# Altium PCB asar_feather.PcbDoc (part 4 of 5)
Units mm, origin at the board's own origin, x right, y up, seen from the top; angles counter-clockwise.
Board outline 50.8 x 22.86 mm, 6 copper layers (Top Layer, L2-GND, L3-SIG, L4-SIG, L5-VCC3V3, Bottom Layer), stack 1.568 mm thick; 181 components, 156 nets, 840 pads, 1779 vias.
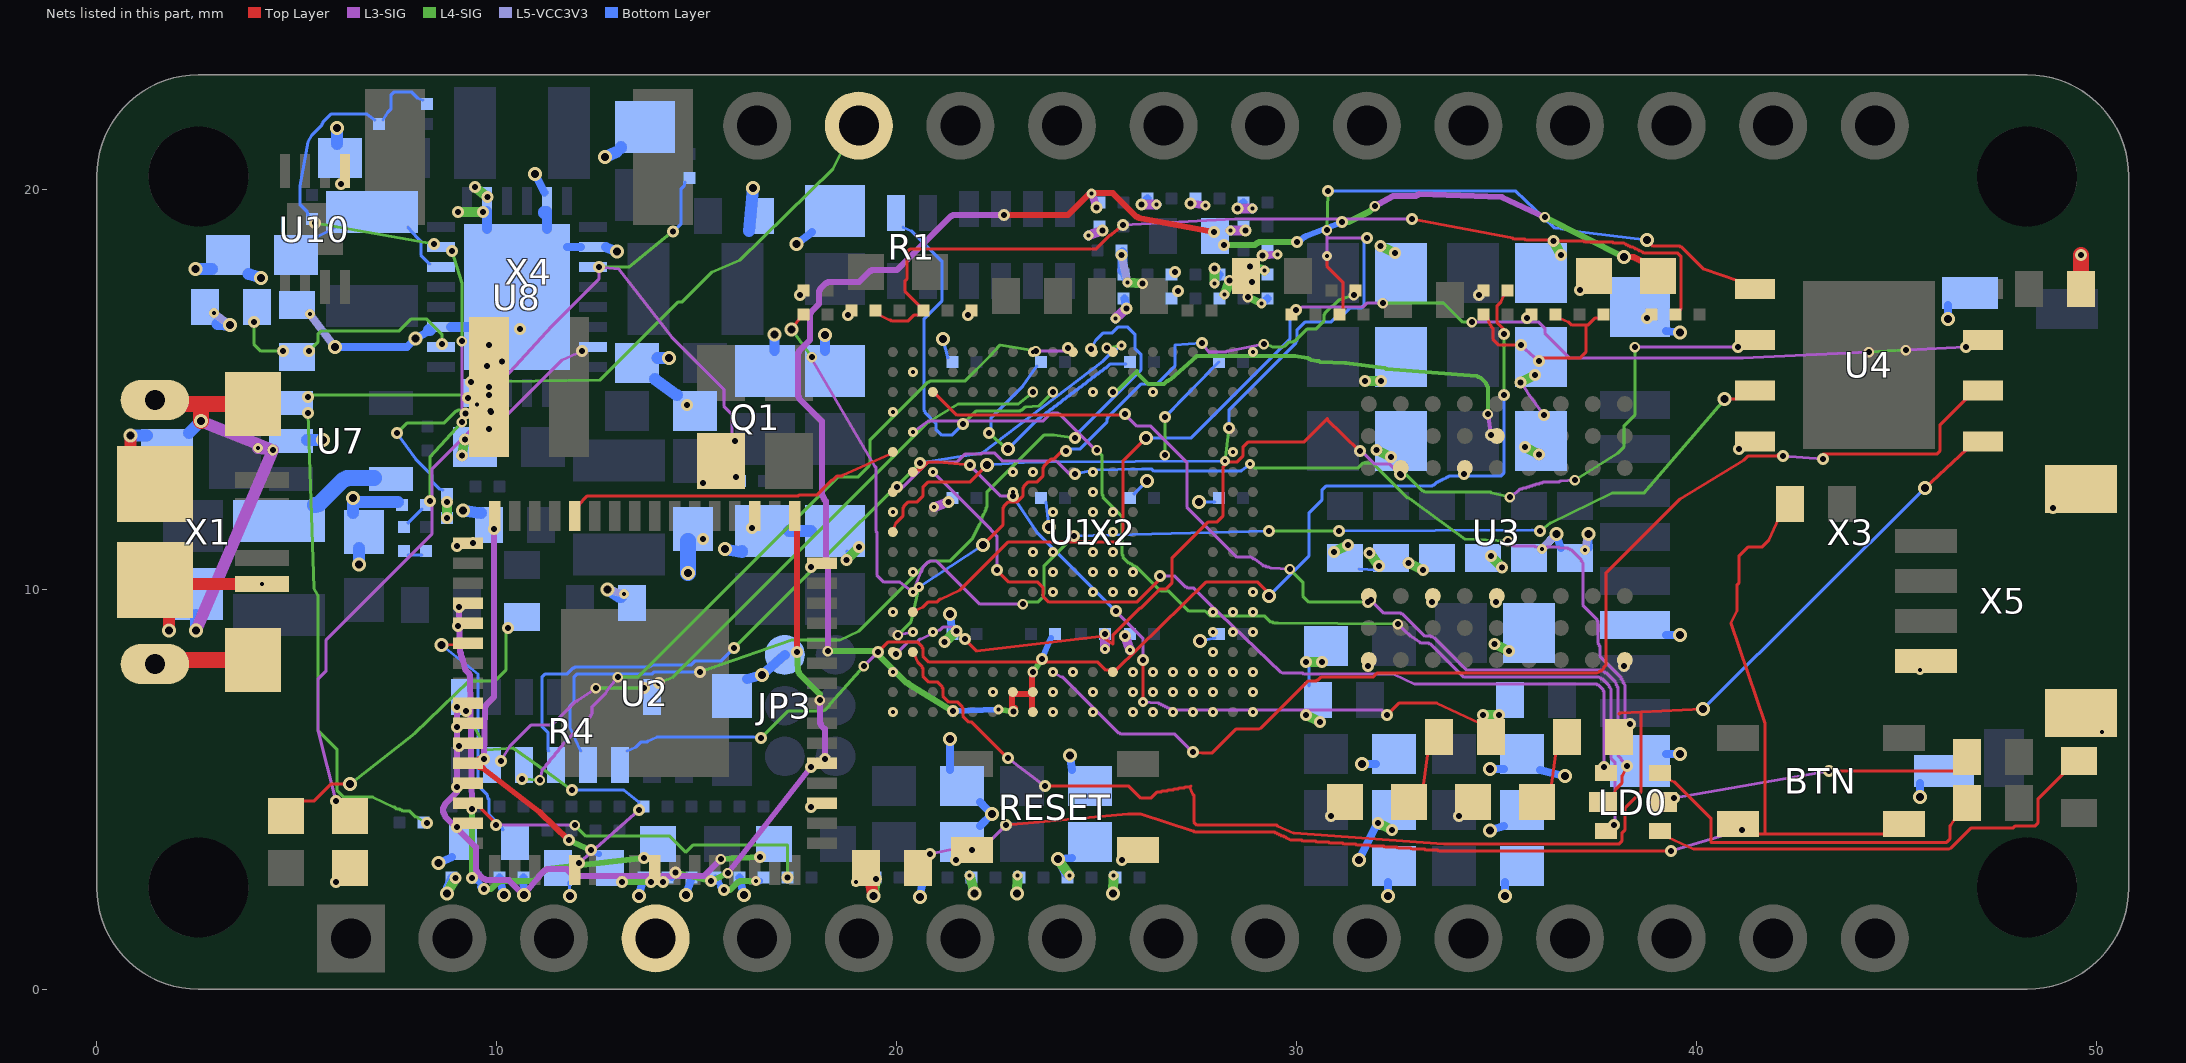
[diagram p7: the nets of this part, all layers, seen from the top]

## Via types
v1: diameter 0.27, hole 0.15, L3-SIG to L4-SIG, tented both sides, 307 vias
v2: diameter 0.3, hole 0.15, L5-VCC3V3 to Bottom Layer, tented both sides, 286 vias
v3: diameter 0.3, hole 0.15, L4-SIG to L5-VCC3V3, tented both sides, 241 vias
v4: diameter 0.3, hole 0.15, Top Layer to L2-GND, tented both sides, 219 vias
v5: diameter 0.3, hole 0.15, L2-GND to L3-SIG, tented both sides, 201 vias
v6: diameter 0.25, hole 0.1, Top Layer to L2-GND, tented both sides, 177 vias
v7: diameter 0.25, hole 0.1, L2-GND to L3-SIG, tented both sides, 125 vias
v8: diameter 0.35, hole 0.2, Top Layer to Bottom Layer, tented both sides, 109 vias
v9: diameter 0.25, hole 0.1, L4-SIG to L5-VCC3V3, tented both sides, 64 vias
v10: diameter 0.25, hole 0.1, L5-VCC3V3 to Bottom Layer, tented both sides, 46 vias
v11: diameter 0.3, hole 0.15, L3-SIG to L4-SIG, tented both sides, 4 vias

## Nets (pads, with @x,y where several pads share a name; then routed paths per layer and width w, separated by ;. In a path a pad name is that pad's centre, name@x,y a point inside that pad or via, vN(x,y) a via of type N, cw(c..) or ccw(c..) an arc to the next point about the centre after c; other vN are vias at no path point) (continued)
EN: R26.2 U7.3 U8.28 X2.18 | length 28
  L4-SIG w0.076: v3(5.275,14.4) 5.425,10.025 5.525,9.85 5.525,6.475 6,6 6,4.975 6.175,4.8 6.9,4.8 7.425,4.55 7.45,4.55 7.5,4.5 7.575,4.5 7.6,4.475 7.625,4.475 7.65,4.45 7.825,4.45 7.975,4.3 8,4.3 v3(8.25,4.15) ; v3(5.275,14.8) 5.325,14.85 9.2,14.85 v3(9.275,14.775) ; v3(9.35,15.175) 12.575,15.225 14.525,17.175 14.625,17.175 15.375,17.925 16.075,18.225 18.4,20.5 X2.18@18.65,21
  Bottom Layer w0.076: v3(5.275,14.4) U7.3@5.275,14.425
  other v2: 8.25,4.15 5.275,14.4 9.275,14.775 5.275,14.8 9.35,15.175
FLASH-CS#: R7.1 U1.K19 U4.1 | length 32
  Top Layer w0.076: U1.K19@19.925,11.525 19.975,11.65 20.15,11.825 20.15,12.025 20.175,12.05 20.175,12.075 20.275,12.175 20.5,12.175 20.65,12.325 20.65,12.55 20.775,12.675 21.825,12.675 v8(22.25,13.1) ; v6(30.75,18.325) 30.75,18.075 31.15,17.675 R7.1@31.15,16.975 ; v8(38.75,18.725) 38.9,18.575 39.575,18.575 39.6,18.55 39.625,18.55 40.175,18 U4.1@41.05,17.7
  L3-SIG w0.076: v6(30.75,18.325) v1(30.75,18.975) ; 30.75,18.775 v3(31.75,18.775)
  L4-SIG w0.076: v9(28.2,13.2) v3(28.3,14.025) ; v1(30.75,18.975) v3(30.775,19.95)
  Bottom Layer w0.076: v8(22.25,13.1) 23.375,13.175 23.725,13.175 v9(28.2,13.2) ; v3(28.3,14.025) 28.3,14.475 29.975,16.15 30,16.2 30,16.475 30.2,16.675 30.85,16.675 30.95,16.775 31.075,16.775 31.325,17.025 31.6,17.025 31.675,17.1 31.675,18.7 v3(31.75,18.775) ; v3(30.775,19.95) 35.475,19.95 36.425,19.05 36.45,19.025 36.6,19.025 36.625,19 36.775,19 36.8,18.975 36.85,18.975 36.875,18.95 36.9,18.95 v8(38.75,18.725)
  other v1: 31.75,18.775
  other v2: 28.3,14.025 31.75,18.775 30.775,19.95
  other v7: 30.75,18.325
  other v10: 28.2,13.2
FLASH-D00: U1.D18 U4.5 | length 35.4
  Top Layer w0.076: U1.D18@20.45,8.35 20.525,8.175 20.625,8.075 20.625,8.05 20.65,8.025 20.65,7.825 20.8,7.675 21.025,7.675 21.125,7.575 21.125,7.55 21.15,7.525 21.15,7.325 21.3,7.175 21.525,7.175 21.625,7.075 21.625,7.05 21.65,7.025 21.65,6.825 21.8,6.675 21.875,6.675 v4(22.775,5.775) ; v4(23.7,5.075) 25.8,5.075 26.1,4.775 26.35,4.775 26.5,4.925 26.6,4.925 26.625,4.95 26.75,4.95 26.775,4.975 26.9,4.975 26.925,5 27.025,5 27.05,5.025 27.175,5.025 27.2,5.05 27.325,5.05 ; 27.35,5.075 27.325,5.05 ; 38.05,6.875 38.075,6.9 38.1,6.9 v8(40.15,7) ; 38.6,6.925 38.6,4.925 38.2,4.525 38.2,3.975 38.125,3.9 38.125,3.7 38.05,3.625 33.675,3.625 29.925,3.9 29.525,4.075 29.5,4.1 27.5,4.1 27.425,4.175 27.425,4.85 27.4,4.875 27.325,5.05 ; v8(45.7,12.525) U4.5@46.75,13.5
  L3-SIG w0.076: v4(22.775,5.775) v4(23.7,5.075)
  Bottom Layer w0.076: v8(40.15,7) v8(45.7,12.525)
  other v5: 23.7,5.075 22.775,5.775
FLASH-D01: U1.D19 U4.2 | length 28.9
  Top Layer w0.076: v4(21.7,8.75) 22,8.45 25.075,8.812 25.238,8.738 25.4,8.625 25.4,8.85 26.075,9.525 26.1,9.525 26.575,10 26.725,10 26.875,10.15 26.875,10.775 27.775,11.675 28,11.675 28.15,11.825 28.15,13.05 28.275,13.175 28.5,13.175 28.65,13.325 28.65,13.55 28.775,13.675 30.175,13.675 30.772,14.272 ; 30.75,14.25 v4(31.575,13.45) ; v4(41.025,16.05) U4.2@41.05,16.05
  L3-SIG w0.076: v4(19.975,8.375) 20.275,8.675 20.5,8.675 20.575,8.75 20.6,8.75 21.05,8.975 21.075,8.975 21.15,9.05 21.4,9.05 v4(21.7,8.75) ; v4(31.575,13.45) 31.625,13.45 31.95,13.125 32.325,13.125 v1(32.6,12.85) ; v1(35.325,12.3) 35.55,12.475 35.575,12.5 35.625,12.5 35.65,12.525 35.725,12.525 35.75,12.55 35.8,12.55 35.825,12.575 35.875,12.575 35.9,12.6 35.95,12.6 35.975,12.625 36.05,12.625 36.075,12.65 36.125,12.65 36.15,12.675 36.55,12.675 36.575,12.7 36.6,12.7 v1(36.95,12.725) ; v1(38.45,16.05) v4(41.025,16.05)
  L4-SIG w0.076: v1(32.6,12.85) 32.75,12.85 33.15,12.45 33.175,12.45 33.2,12.425 34.85,12.425 34.875,12.4 v1(35.325,12.3) ; v1(36.95,12.725) 38.025,13.4 38.175,13.55 38.175,14.075 38.45,14.35 v1(38.45,16.05)
  other v5: 19.975,8.375 21.7,8.75 31.575,13.45 41.025,16.05
FLASH-D02: R2.1 U1.G18 U4.3 | length 32.2
  Top Layer w0.076: v8(17.37,16.495) R2.1@17.575,16.775 ; v8(40.695,14.75) U4.3@40.988,14.753
  L3-SIG w0.076: v1(17.875,15.8) 17.85,15.8 19.45,13.075 19.475,13.05 19.475,11.45 19.5,11.425 19.5,10.35 19.675,10.175 20.075,10.175 20.4,9.925 20.6,10.425 20.625,10.45 20.625,10.5 20.65,10.525 20.65,10.55 20.775,10.675 20.8,10.675 20.825,10.7 20.975,10.7 21.025,10.675 22.075,9.625 v1(23.15,9.625)
  L4-SIG w0.076: v8(17.37,16.495) v1(17.875,15.8) ; v1(23.15,9.625) 23.2,9.675 23.525,9.675 23.65,9.8 23.65,9.85 23.675,9.875 23.675,10.575 v3(24.425,11.325) ; v3(29.3,11.45) v3(31.05,11.45) ; v3(36.075,11.45) 36.335,11.65 37.875,12.4 38.675,12.4 v8(40.695,14.75)
  Bottom Layer w0.076: v3(24.425,11.325) v3(29.3,11.45) ; v3(31.05,11.45) 35.875,11.475 v3(36.075,11.45)
  other v2: 24.425,11.325 29.3,11.45 31.05,11.45 36.075,11.45
  other v6: 20.4,9.93
  other v7: 20.4,9.93
FLASH-D03: R6.1 U1.F18 U4.7 | length 31.5
  Top Layer w0.076: U1.F18@20.475,9.475 20.65,9.55 20.775,9.675 21,9.675 21.075,9.75 21.1,9.75 21.575,9.975 22.775,11.175 25.5,11.175 25.65,11.325 25.65,13.2 v8(26.225,13.775) ; v4(46.725,16.05) U4.7@46.75,16.05
  L3-SIG w0.076: v4(29.975,16.975) 30.125,17.05 31.65,17.05 31.75,17.15 v1(32.15,17.15) ; v1(34.375,16.675) 36.05,16.675 36.2,16.525 36.2,16.4 36.825,15.775 41.15,15.775 v1@44.306,15.931 ; v1(45.225,15.975) v1@45.25,15.975 ; v1@45.258,15.978 v4(46.725,16.05)
  L4-SIG w0.076: v1(32.15,17.15) 33.675,17.15 34.15,16.675 v1(34.375,16.675) ; v1(44.3,15.925) v1(45.225,15.975)
  Bottom Layer w0.076: v8(26.225,13.775) 27.35,13.775 29.825,16.25 29.825,16.825 v4(29.975,16.975)
  other v1: 29.975,16.975
  other v2: 29.975,16.975
  other v3: 29.975,16.975
  other v5: 46.725,16.05 29.975,16.975
FPGA-CCLK: U1.C11 U4.6 | length 29.1
  Top Layer w0.076: v4(27.4,5.925) 27.625,5.9 27.875,5.9 28.475,6.5 29.05,6.5 29.1,6.525 30.275,7.7 30.475,7.7 30.5,7.725 30.525,7.725 30.6,7.8 31.9,7.8 32,7.9 37.5,7.9 37.55,7.925 37.575,7.95 37.6,7.95 37.675,8.025 37.675,8.05 37.725,8.1 37.725,10.4 39.575,12.25 41.175,13.225 41.275,13.325 42,13.325 42.05,13.375 42.075,13.375 v4(42.15,13.325) ; v4(43.15,13.25) v4@43.15,13.375 ; v4@43.16,13.375 46,13.375 46.075,13.45 46.075,14.1 U4.6@46.75,14.775
  L3-SIG w0.076: v7@23.9,7.925 24.125,7.8 24.15,7.8 25.55,6.4 25.575,6.4 25.6,6.375 26.95,6.375 v4(27.4,5.925) ; v4(42.15,13.325) v4(43.15,13.25)
  other v5: 27.4,5.925 43.15,13.25 42.15,13.325
  other v6: 23.9,7.93
  other v7: 23.9,7.93
FPGA-DONE: R4.7 R4.15 U1.U12 | length 16.6
  L3-SIG w0.076: v2(10.1,5.7) 10.325,6.075 10.85,6.6 11.375,6.6 11.975,7.2 12,7.2 12.025,7.225 v1(12.475,7.525)
  L4-SIG w0.076: v1(12.475,7.525) v3(13.675,7.525) ; v3(14.05,7.65) 14.4,7.8 20.775,14.175 20.8,14.175 20.825,14.2 21.525,14.625 23.025,14.625 v1@23.4,14.925
  Bottom Layer w0.076: v3(13.675,7.525) R4.7@13.7,7.525
  other v1: 10.1,5.7 23.4,14.93
  other v2: 13.675,7.525 14.05,7.65
  other v3: 10.1,5.7
  other v6: 23.4,14.93
  other v7: 23.4,14.93
FPGA-INIT#: R1.1 U1.U11 | length 9.2
  L4-SIG w0.076: v3(21.65,14.125) 21.975,14.45 23.075,14.45 23.1,14.475 23.125,14.475 23.2,14.55 23.225,14.55 23.55,14.575 v1@23.9,14.925
  Bottom Layer w0.076: R1.1@20.15,19.05 20.375,18.95 21.125,18.2 21.125,17.2 20.675,16.75 20.675,14.475 20.7,14.45 20.7,14.425 20.975,14.15 20.975,14 21.125,13.85 21.375,13.85 v3(21.65,14.125)
  other v1: 23.9,14.93
  other v2: 21.65,14.125
  other v6: 23.9,14.93
  other v7: 23.9,14.93
FPGA-TCK: R4.11 R5.2 U1.C8 | length 31
  Top Layer w0.076: v4(19.525,8.425) 19.775,8.675 20.525,8.675 20.625,8.575 20.625,8.55 20.65,8.525 20.65,8.325 20.8,8.175 25.025,8.175 25.225,7.975 U1.C8@25.325,7.975 ; U1.C8@25.475,7.975 27.725,10.175 29.025,10.175 29.3,9.9 v8(29.3,9.825) ; v1(35.175,16.375) 35.175,16.5 35,16.675 35,17.075 35.1,17.175 R5.2@35.175,17.35
  L3-SIG w0.076: v1(19.175,8.075) v4(19.525,8.425)
  L4-SIG w0.076: v3(16.6,6.275) 17.275,6.95 18.15,6.95 18.2,6.975 18.325,7.1 18.325,7.125 18.35,7.15 v1(19.175,8.075) ; v3(35.175,14.85) v1(35.175,16.375)
  Bottom Layer w0.076: R4.11@13.25,5.95 13.475,6.05 13.6,6.175 13.75,6.175 13.775,6.2 14,6.3 16.425,6.3 v3(16.6,6.275) ; v8(29.3,9.825) 30.3,10.825 30.3,11.9 30.625,12.225 30.625,12.475 30.725,12.575 33.375,12.575 33.4,12.6 33.425,12.6 33.5,12.675 33.525,12.675 33.55,12.7 33.575,12.7 33.6,12.725 33.625,12.725 33.65,12.75 33.675,12.75 33.725,12.775 33.75,12.8 33.775,12.8 33.8,12.825 35.1,12.825 35.175,12.9 v3(35.175,14.85)
  other v2: 16.6,6.275 35.175,14.85
  other v4: 35.175,16.375
  other v5: 19.525,8.425 35.175,16.375
FPGA-TDI: R4.14 U1.W10 | length 19
  Top Layer w0.076: v4(24.275,16.025) U1.W10@24.325,15.975
  L3-SIG w0.076: v1(11.075,5.225) 11.125,5.45 11.125,5.475 11.225,5.575 11.225,5.6 11.325,5.7 11.325,5.725 11.45,5.85 11.45,5.875 11.55,5.975 11.55,6 11.65,6.1 11.65,6.125 12.35,6.825 12.35,6.85 12.375,6.875 12.375,7.05 12.725,7.4 12.75,7.45 v1(13.025,7.8) ; v1@23.471,15.95 24.2,15.95 v4(24.275,16.025)
  L4-SIG w0.076: v3(10.625,5.25) v1(11.075,5.225) ; v1(13.025,7.8) 13.525,7.8 18.525,12.8 19.025,12.8 19.3,13.075 19.3,13.1 19.325,13.125 19.325,13.725 20.775,15.175 20.8,15.175 20.825,15.2 21.7,15.2 22.317,15.817 ; 22.325,15.825 22.575,16.1 v1(23.475,15.95)
  other v2: 10.625,5.25
  other v5: 24.275,16.025
FPGA-TDO: R4.13 U1.W8 | length 20
  Top Layer w0.076: v6(25.25,16.03) U1.W8@25.3,16
  L4-SIG w0.076: v3(15.925,8.525) 18.625,11.225 v3(20.575,13.15) ; v6(25.25,16.03) v9(25.615,16.094)
  Bottom Layer w0.076: R4.13@11.3,5.95 11.275,5.975 11.275,6.425 11.125,6.575 11.125,7.8 11.2,7.875 11.75,7.875 11.9,8.025 11.925,8.025 11.95,8.05 13.8,8.05 13.825,8.075 13.85,8.075 13.875,8.1 14.85,8.1 14.95,8.2 15.6,8.2 v3(15.925,8.525) ; v3(20.575,13.15) 22.125,13.4 25.15,15.7 25.3,15.85 v9(25.615,16.094)
  other v1: 25.25,16.03
  other v2: 15.925,8.525 20.575,13.15
  other v7: 25.25,16.03
  other v10: 25.615,16.094
FPGA-TMS: R4.12 U1.W9 | length 22
  Top Layer w0.076: U1.W9@24.825,15.975 U1.W9@24.825,16
  L4-SIG w0.076: v3(15.075,7.925) 17.375,8.725 18.575,8.725 19.05,8.95 20.775,10.675 20.8,10.675 20.825,10.7 21.325,10.7 21.9,11.275 21.9,11.3 21.925,11.325 21.925,11.35 21.95,11.375 21.95,11.4 21.975,11.425 21.975,11.45 22,11.475 22,11.5 22.025,11.525 22.025,11.55 22.05,11.575 22.05,11.6 22.075,11.625 22.1,11.675 22.1,11.725 22.125,11.75 22.125,11.8 22.15,11.825 22.15,11.85 22.175,11.875 22.2,11.925 22.2,11.95 22.225,11.975 22.225,12.025 22.25,12.05 22.25,12.425 23.675,13.85 23.925,13.85 v3(24.45,13.775)
  Bottom Layer w0.076: R4.12@12.1,5.95 11.825,6.55 11.825,7.075 11.925,7.175 11.925,7.8 12,7.875 13.875,7.875 13.925,7.925 v3(15.075,7.925) ; v3(24.45,13.775) 24.45,13.825 26.1,15.475 26.1,15.875 25.95,16.025 25.95,16.375 25.775,16.55 25.525,16.55 25.447,16.472 ; v3(24.85,16) 24.975,16.225 25.15,16.4 25.375,16.4 25.45,16.475
  other v1: 24.85,16
  other v2: 15.075,7.925 24.45,13.775 24.85,16
  other v6: 24.85,16
  other v7: 24.85,16
FT-PWREN#: U1.P19 U2.60 | length 8.2
  Top Layer w0.076: U2.60@12.05,12.1 12.175,12.25 12.25,12.325 17.525,12.325 17.55,12.35 18,12.35 18.375,12.725 18.4,12.725 18.5,12.825 18.625,12.825 18.65,12.85 U1.P19@19.825,13.375
FT-REF: R18.2 U2.6 | length 5.6
  Top Layer w0.076: v8(8.62,8.605) U2.6@8.925,8.62
  Bottom Layer w0.076: v8(8.62,8.605) 9.525,7.88 9.525,5.1 9.75,4.875 9.775,4.775 9.8,4.75 9.8,4.375 10.125,4.05 R18.2@10.15,3.975
FT-RESETN: R19.1 U2.14 | length 9.1
  Top Layer w0.076: U2.14@9.55,4.55 9.575,4.55 9.975,4.15 v4(9.975,4.1)
  L3-SIG w0.076: v4(9.975,4.1) v1(11.95,4.1)
  L4-SIG w0.076: v1(11.95,4.1) 12.225,3.825 14.325,3.825 14.725,3.425 14.9,3.6 17.27,3.6 v3(17.27,2.795)
  other v2: 17.27,2.795
  other v5: 9.975,4.1
FT-VCORE: C139.2 C152.2 C153.2 C154.2 U2.12 U2.37 U2.49 U2.64 | length 23.3
  Top Layer w0.15: U2.12@9.55,5.55 9.65,5.525 11.075,4.425 v4(11.8,3.725) ; U2.12@9.55,5.75 v4(9.675,5.75) ; v4(9.925,11.5) U2.64@9.925,11.525 ; v4(17.5,8.425) U2.49@17.5,11.525
  L3-SIG w0.15: v4(9.675,5.75) 9.7,7.05 9.725,7.075 9.725,7.1 9.925,7.3 v4(9.925,11.5) ; v1(15.775,2.9) v4(17.85,5.55) ; v1(18.075,7.225) 18.075,6.65 18.1,6.625 18.1,6.6 18.2,6.5 v4(18.2,5.75)
  L4-SIG w0.15: v4(11.8,3.725) v3(12.35,3.475) ; v3(13.125,2.675) v3(14.15,2.675) ; v3(14.47,2.92) v3(15.35,2.7) v1(15.775,2.9) ; v3(15.675,2.475) 15.825,2.475 16.025,2.675 16.05,2.675 16.075,2.7 v9(16.475,2.7) ; v4(17.5,8.425) 17.525,7.95 17.55,7.925 17.55,7.9 18.075,7.375 v1(18.075,7.225)
  Bottom Layer w0.15: v3(12.35,3.475) C139.2@12.55,3.375 ; C139.2@13.1,2.675 v3(13.125,2.675) ; C152.2@14.375,2.775 v3(14.47,2.92) ; C153.2@15.47,2.795 v3(15.675,2.475) v2@15.575,2.55 ; v9(16.475,2.7) C154.2@16.575,2.7
  other v1: 11.8,3.725 17.5,8.425
  other v2: 15.675,2.475 13.125,2.675 14.15,2.675 15.35,2.7 14.47,2.92 12.35,3.475
  other v5: 11.8,3.725 17.85,5.55 9.675,5.75 18.2,5.75 17.5,8.425 9.925,11.5
  other v10: 16.475,2.7
FT-VPHY: C40.2 L4.1 U2.4 | length 11.6
  L3-SIG w0.15: v4(9.05,9.55) 9.075,8.5 9.075,8.425 9.1,8.4 9.1,8.325 9.125,8.3 9.125,8.25 9.15,8.225 9.175,8.125 9.2,8.025 9.2,8 9.3,7.9 9.3,7.875 9.325,7.85 v1(9.375,4.5)
  L4-SIG w0.15: v3(9.375,2.775) v1(9.375,4.5) ; v3(9.675,2.5) 9.85,2.5 10.025,2.675 10.05,2.675 10.075,2.7 10.925,2.7 11.2,2.975 11.225,2.975 11.25,3 v3(13.675,3.275)
  Bottom Layer w0.15: C40.2@9.47,2.795 v3(9.675,2.5) v2@9.575,2.55
  other v2: 9.675,2.5 9.375,2.775 13.675,3.275
  other v5: 9.05,9.55
FT-VPLL: C41.2 L5.1 U2.9 | length 13.1
  L3-SIG w0.15: v4(9,7.05) 9,4.925 8.7,4.625 8.7,4.6 8.675,4.575 8.675,4.55 8.65,4.525 8.65,4.425 8.675,4.4 8.675,4.375 8.7,4.35 8.7,4.325 9.475,3.55 9.475,2.975 9.5,2.95 9.5,2.925 9.675,2.75 9.7,2.75 9.725,2.725 10.3,2.725 v8(10.675,2.35) 11.025,2.775 11.05,2.8 11.05,2.825 11.2,2.975 11.225,2.975 11.25,3 11.75,3 11.9,2.85 11.925,2.85 11.95,2.825 15.175,2.825 v1(15.6,3.25)
  L4-SIG w0.15: v1(15.6,3.25) v3(16.575,3.3)
  Bottom Layer w0.15: v8(10.675,2.35) 10.675,2.55
  Bottom Layer w0.2: C41.2@10.67,2.795 v8(10.675,2.35)
  other v2: 16.575,3.3
  other v5: 9,7.05
GND: C3.1 C4.1 C5.1 C6.1 C7.1 C8.1 C9.1 C11.1 C12.1 C13.1 C38.1 C40.1 C41.1 C78.1 C80.1 C82.1 C84.1 C85.2 C86.2 C87.2 C88.2 C89.2 C90.2 C91.2 C92.2 C93.2 C94.2 C95.2 C96.2 C97.2 C98.2 C99.2 C100.2 C101.2 C102.2 C103.2 C104.2 C105.2 C106.2 C107.2 C108.2 C109.2 C110.2 C111.2 C112.2 C113.2 C114.2 C115.2 C116.2 C117.2 C118.2 C119.2 C120.2 C121.2 C122.2 C133.1 C134.1 C135.1 C136.1 C137.1 C138.1 C139.1 C140.2 C141.2 C142.2 C143.2 C144.2 C145.2 C146.2 C147.1 C148.1 C149.1 C150.1 C151.1 C152.1 C153.1 C154.1 C155.1 C156.1 C157.1 C158.1 C159.1 C160.1 C161.1 C167.1 C168.1 JP3.3 L6.1 LD1.K LD2.K LD3.K Q1.2 R5.1 R11.1 R13.2 R15.1 R17.2 R18.1 R21.1 R22.1 R86.1 R102.2 R103.2 R114.2 R116.2 RESET.3 RESET.4 U1.A1 U1.A3 U1.A4 U1.A5 U1.A6 U1.A7 U1.A9 U1.A11 U1.A19 U1.B1 U1.B3 U1.B4 U1.B5 U1.B6 U1.B7 U1.B9 U1.B11 U1.B14 U1.C1 U1.C2 U1.C3 U1.C4 U1.C5 U1.C6 U1.C7 U1.C10 U1.C19 U1.D3 U1.E1 U1.E2 U1.E3 U1.E17 U1.F1 U1.F2 U1.F3 U1.F19 U1.G1 U1.G7 U1.G8 U1.G9 U1.G11 U1.H7 U1.H8 U1.H9 U1.H11 U1.H12 U1.H18 U1.J8 U1.J9 U1.J11 U1.J12 U1.K8 U1.L8 U1.L9 U1.L11 U1.L19 U1.M9 U1.M13 U1.N9 U1.N12 U1.N13 U1.P2 U1.T19 U1.U6 U1.U9 U1.V18 U1.W1 U1.W12 U2.1 U2.5 U2.10 U2.11 U2.13 U2.15 U2.25 U2.35 U2.47 U2.51 U3.A1 U3.A3 U3.B7 U3.C3 U3.D7 U3.E3 U3.J1 U4.4 U7.2 U8.3 U8.10 U8.13 U8.16 U8.27 U8.29 U10.5 X1.5 X1.MH1 X1.MH2 X1.MP1 X1.MP2 X1.MP3 X1.MP4 X2.4 X3.6 X3.G1 X3.G2 X3.G3 X3.G4 X4.2 X5.1 X5.MP1 X5.MP2 | length 90.4
  Top Layer w0.3: X1.MP3@0.84,13.43 v8(0.84,13.84) ; X1.MP4@1.45,10.13 v6(4.125,10.13) ; v8(1.8,8.965) X1.MP4@1.8,9.43 ; R86.1@19.35,2.65 v8(19.415,2.325)
  Top Layer w0.4: X1.MH2@1.45,8.23 X1.MP2@3.9,8.23 ; X1.MH1@1.45,14.63 X1.MP1@3.9,14.63 ; v8(2.6,14.2) 2.6,14.63 ; C11.1@49.6,17.505 v4(49.6,18.35)
  L3-SIG w0.076: v5@35.6,15.175 35.75,14.95 35.775,14.9 v3(36.175,14.35)
  L3-SIG w0.2: v7(9.507,14.623) v10(9.837,14.45) ; v7(24.87,19.895) v2(24.995,19.545) ; v2(27.345,19.645) v7(27.72,19.595) ; v2(29.145,18.345) v7(29.52,18.37)
  L3-SIG w0.25: v7(20.933,12.05) v2(21.29,12.18) ; v7(24.795,18.845) v2(25.145,18.97) ; v7(25.2,8.5) v10(25.2,8.88) ; v7(25.47,16.77) v2(25.745,17.02) ; v2(25.705,8.83) v7(25.83,8.48) ; v2(26.12,19.62) v7(26.495,19.62) ; v7(28.34,18.97) v2(28.72,18.97) ; v2(28.52,19.52) v7(28.895,19.52)
  L3-SIG w0.3: v8(2.48,8.97) v10(4.4,13.48) ; v8(2.6,14.2) v10(4.4,13.48) ; v7(4.03,13.53) v10(4.4,13.48)
  L4-SIG w0.076: v3(22.3,13.9) v8(22.775,13.5) ; v1(26.7,13.35) 26.7,13.575 v3(26.7,14.3)
  L4-SIG w0.2: v1(28.776,17.306) v10(29.12,17.145)
  L4-SIG w0.25: v8(8.75,2.39) v3(8.965,2.775) ; v2(8.75,11.775) v1(8.75,12.175) ; v1(9.025,19.425) v3(9.65,19.425) ; v1(9.125,13.349) v2(9.2,13.738) ; v1(9.453,20.057) v2(9.763,19.81) ; v2(9.75,15.575) v1(10.129,15.689) ; v1(18.737,10.732) v2(19.055,11.05) ; v8(19.415,2.325) v3(19.48,2.75) ; v1(21.19,8.68) v2(21.49,8.955) ; v10(21.82,2.845) v8(21.945,2.392) ; v8(23,2.388) v10(23.02,2.845) ; v8(24.025,3.25) v10(24.32,2.845) ; v8(25.4,2.388) v10(25.42,2.845) ; v10(25.77,17.67) v1(26.145,17.645) ; v10(27.945,17.645) v1(27.945,18.02) ; v10(28.195,17.37) v1(28.32,17.72) ; v1(28.828,18.068) v10(29.195,17.97) ; v1(30.225,8.175) v2(30.63,8.18) ; v2(30.23,6.855) v1(30.584,6.678) ; v2(30.925,10.93) v1(31.279,11.107) ; v1(31.7,15.2) v2(32.1,15.2) ; v1(31.822,10.904) v2(32.05,10.58) ; v1(31.996,13.477) v2(32.35,13.3) ; v2(32.03,4.155) v1(32.384,3.978) ; v1(32.096,18.577) v2(32.45,18.4) ; v1(32.796,10.652) v2(33.15,10.475) ; v1(34.65,6.85) v3(35.05,6.85) ; v2(34.85,10.83) v1(35.127,10.547) ; v1(34.946,8.627) v2(35.3,8.45) ; v1(35.596,15.173) v2(35.95,15.35) ; v2(35.7,13.55) v1(36.054,13.373) ; v1(36.423,18.704) v2(36.6,18.35)
  L5-VCC3V3 w0.2: v10(2.925,16.9) v8(3.325,16.6) ; v10(5.325,16.875) v8(5.95,16.05) ; v8(12.77,9.991) v10(13.175,9.875) ; v2(25.62,18.35) v10(25.77,17.67) ; v10(36.125,11.005) v8(36.49,11.385) ; v10(37.2,10.98) v8(37.295,11.385)
  Bottom Layer w0.076: v8@8.75,2.525 v8@8.75,2.55 ; v8(10.175,2.35) 10.175,2.55 ; C139.1@11.8,2.675 v8(11.825,2.325) ; v8(13.55,2.325) 13.55,2.55 ; v8(14.725,2.35) 14.75,2.55 ; v8(16.175,2.35) 16.175,2.55 ; C97.2@17.875,18.925 C97.2@17.875,18.95 ; C86.2@18.75,10.925 C86.2@18.75,10.95 ; v8(20.575,2.3) 20.575,2.55 ; v8(21.15,16.25) C110.2@21.275,15.775 ; v3(22.3,13.9) 22.35,13.95 22.35,14.275 23.15,15.075 C107.2@23.5,15.575 ; v8(22.775,13.5) 23.55,14.275 23.575,14.275 23.65,14.35 23.675,14.35 23.75,14.425 23.775,14.425 23.85,14.5 23.875,14.5 23.95,14.575 23.975,14.575 24.05,14.65 24.075,14.65 24.175,14.75 24.2,14.75 24.275,14.825 24.3,14.825 24.375,14.9 24.4,14.9 24.475,14.975 24.5,14.975 24.575,15.05 24.6,15.05 24.675,15.125 24.7,15.125 24.8,15.225 24.825,15.225 24.9,15.3 24.925,15.3 25,15.375 25.025,15.375 25.1,15.45 25.125,15.45 25.2,15.525 25.225,15.525 25.325,15.625 C109.2@25.725,15.625 ; C89.2@23.725,12.175 v8(23.8,11.55) ; C90.2@25.925,12.375 v8(26.25,12.7) ; v3(26.7,14.3) C113.2@28.05,15.68 ; C114.2@26.975,17.375 v3(27.025,17.45) ; v8(27.55,12.175) C108.2@27.95,12.175 ; v8(27.575,8.7) C112.2@27.95,8.775 ; C9.1@30.3,7.575 C13.1@30.3,8.175 ; C8.1@31.55,10.5 C7.1@32,10.475 ; v2(33.15,10.475) C6.1@33.15,10.5 ; v3(35.05,6.85) C12.1@35.05,6.875 ; C142.2@36.175,14.3 36.175,14.325 v3(36.175,14.35)
  Bottom Layer w0.2: v8(5.95,16.05) 7.75,16.05 v8(7.97,16.27) U8.3@8.27,16.435 ; v8(8.545,3.155) R18.1@8.875,3.3 ; v8(8.75,2.39) 8.75,2.525 C40.1@8.87,2.795 ; U8.27@9.75,15.2 U8.29@9.75,15.55 ; C41.1@10.07,2.795 v8(10.175,2.35) ; v8(10.955,20.38) U8.13@11.19,19.92 ; U8.29@11.75,18.55 U8.16@12.1,18.55 ; v8(13.55,2.325) C152.1@13.67,2.795 ; v8(14.725,2.35) C153.1@14.87,2.795 ; C154.1@16.07,2.795 v8(16.175,2.35) ; v8(17.49,18.63) C97.2@17.875,18.925 ; v8(19.415,2.325) C155.1@19.47,2.795 ; v8(20.575,2.3) C156.1@20.67,2.795 ; C94.2@21.325,5.48 v8(21.325,6.25) ; v8(21.325,9.375) C95.2@21.39,8.88 ; C157.1@21.82,2.745 v8(21.945,2.392) ; C87.2@22.08,4.08 v8(22.375,4.375) C94.2@22.08,4.68 ; v8(23,2.388) C158.1@23.02,2.745 ; C159.1@24.22,2.88 v8(24.025,3.25) C88.2@24.38,3.28 ; v8(24.335,5.837) C99.2@24.38,5.48 ; v8(25.4,2.388) C38.1@25.42,2.745 ; C117.2@25.645,17.95 v10(25.77,17.67) ; C111.2@25.695,17.27 v2(25.745,17.02) ; v2(26.12,19.62) C137.1@26.27,19.77 ; v10(27.945,17.645) C119.2@28.07,17.87 ; v2(28.52,19.52) C136.1@28.67,19.67 ; v10(29.12,17.145) C116.2@29.27,17.27 ; v8(31.55,3.225) C103.2@31.98,4.08 ; v8(31.625,5.635) C105.2@31.98,5.635 ; v8(32.275,2.325) C101.2@32.275,2.68 ; v8(34.825,3.97) C104.2@35.18,4.08 ; v8(34.825,5.51) C106.2@35.18,5.51 ; v8(35.2,2.325) C102.2@35.2,2.68 ; C106.2@36.08,5.48 v8(36.7,5.325) ; C4.1@36.15,11.03 v8(36.49,11.385) C3.1@36.6,11.03 ; C3.1@37.295,11.03 v8(37.295,11.385) ; X3.G1@39.225,5.875 v8(39.58,5.875) ; X3.6@39.225,8.855 v8(39.58,8.85) ; X3.G4@39.225,16.45 v8(39.58,16.415) ; v8(45.575,4.8) X3.G2@45.575,5.155 ; v8(46.275,16.75) X3.G3@46.275,17.105
  Bottom Layer w0.25: U8.3@8.85,16.55 U8.29@9.3,16.55 ; C150.1@9.75,13.9 U8.27@9.75,14.9 ; U8.27@9.75,14.65 v10(9.837,14.45) ; U8.29@9.75,19 U8.10@9.75,19.45 ; U8.29@11.25,19 U8.13@11.25,19.45 ; U8.16@12.73,18.55 v8(13.002,18.44) ; C100.2@16.25,7.75 v8(16.635,7.86) JP3.3@17.2,8.36 ; C93.2@16.94,15.95 v8(16.94,16.365) ; C144.2@18.2,15.95 v8(18.2,16.355) ; C117.2@25.645,17.95 C121.2@25.645,18.42
  Bottom Layer w0.3: v8(0.84,13.84) C149.1@1.25,13.84 ; v8(1.8,8.965) C78.1@1.8,9.375 ; C149.1@2.3,13.9 v8(2.6,14.2) ; v8(2.465,18) C168.1@2.875,18 ; v8(2.48,8.97) C78.1@2.48,9.35 ; C161.1@3.02,16.63 v8(3.325,16.6) ; C168.1@3.795,17.88 v8(4.1,17.785) ; U7.2@5.25,13.73 v8(5.66,13.73) ; C148.1@6,21.125 v8(6,21.535) ; C84.1@6.4,11.9 v8(6.4,12.275) 6.5,12.175 R116.2@7.525,12.175 ; v8(6.55,10.615) C84.1@6.55,11.025 ; U8.3@8.3,16.475 U8.3@8.325,16.475 ; v8(9.155,11.965) C167.1@9.6,11.9 ; U8.13@11.175,19.4 U8.13@11.175,19.425 ; v8(12.71,20.8) C80.1@12.99,20.93 ; v8(12.77,9.991) 13.075,9.8 R102.2@13.1,9.8 ; C80.1@13.1,21.025 C80.1@13.1,21.05 ; C82.1@13.95,15.25 C151.1@14.5,14.85 ; C82.1@14.02,15.775 v8(14.31,15.775) ; v8(14.775,10.4) v8@14.775,10.425 ; v8(15.7,11) 16.125,10.925 C85.2@16.125,10.95 ; C160.1@16.3,18.975 16.3,18.95 v8(16.41,20.03) ; C85.2@17.3,11.45 C86.2@17.85,11.45
  Bottom Layer w0.4: v8(14.775,10.4) C147.1@14.775,11.2
  other v1: 25.705,8.83 25.2,8.88 21.29,12.18 4.4,13.48 36.175,14.35 9.837,14.45 10.575,16.5 25.745,17.02 27.025,17.45 26.95,17.925 29.145,18.345 25.145,18.97 28.72,18.97 24.995,19.545 28.52,19.52 26.12,19.62 27.345,19.645
  other v2: 19.48,2.75 8.965,2.775 35.05,6.85 15.15,11.25 22.3,13.9 26.7,14.3 36.175,14.35 14.75,14.6 10.575,16.5 27.025,17.45 26.95,17.925 9.65,19.425
  other v3: 32.03,4.155 30.23,6.855 30.63,8.18 35.3,8.45 25.705,8.83 21.49,8.955 33.15,10.475 32.05,10.58 34.85,10.83 30.925,10.93 19.055,11.05 15.15,11.25 8.75,11.775 21.29,12.18 32.35,13.3 35.7,13.55 9.2,13.738 14.75,14.6 32.1,15.2 35.95,15.35 9.75,15.575 10.575,16.5 25.745,17.02 26.95,17.925 29.145,18.345 36.6,18.35 32.45,18.4 25.145,18.97 28.72,18.97 24.995,19.545 28.52,19.52 26.12,19.62 27.345,19.645 9.763,19.81
  other v4: 5.975,2.675 13.85,2.675 21.475,3.225 25.625,3.225 21.875,3.475 9,4.05 30.85,4.325 34.05,4.325 17.85,4.55 9,5.05 9.05,6.075 9,6.55 31.775,8.075 38.175,8.075 9.025,9.075 31.775,9.675 33.375,9.675 34.975,9.675 17.85,10.55 9,11.075 9.4,11.15 16.375,11.525 48.9,12.025 15.15,12.65 32.575,12.875 34.175,12.875 41.05,13.5 9.8,14 9.215,14.39 9.85,14.425 9.8,15.05 9.8,16.1 10.575,16.5 35.75,16.775 38.75,16.775 18.775,16.85 21.775,16.85 17.575,17.35 34.55,17.35 37.075,17.475 28.88,17.68 9.025,19.425 6.1,20.125
  other v5: 32.384,3.978 30.584,6.678 34.65,6.85 30.225,8.175 34.946,8.627 21.19,8.68 35.127,10.547 32.796,10.652 18.737,10.732 31.822,10.904 31.279,11.107 15.15,11.25 8.75,12.175 9.125,13.349 36.054,13.373 31.996,13.477 14.75,14.6 35.596,15.173 31.7,15.2 10.129,15.689 10.575,16.5 27.945,18.02 32.096,18.577 36.423,18.704 9.025,19.425 9.453,20.057
  other v6: 18.975,2.675 50.125,6.425 19.9,6.93 23.9,6.93 24.9,6.93 25.9,6.93 26.4,6.93 26.9,6.93 27.4,6.93 27.9,6.93 28.9,6.93 22.4,7.43 23.9,7.43 24.9,7.43 25.9,7.43 26.4,7.43 26.9,7.43 27.4,7.43 27.9,7.43 28.9,7.43 19.9,7.93 24.4,7.93 25.9,7.93 26.4,7.93 26.9,7.93 27.4,7.93 27.9,7.93 28.4,7.93 28.9,7.93 45.575,7.975 27.9,8.43 20.9,8.93 27.9,8.93 28.4,8.93 28.9,8.93 19.9,9.43 27.9,9.43 28.4,9.43 28.9,9.43 23.9,9.93 24.9,9.93 25.4,9.93 25.9,9.93 28.9,9.93 20.4,10.43 23.4,10.43 23.9,10.43 24.9,10.43 25.4,10.43 25.9,10.43 23.4,10.93 23.9,10.93 24.9,10.93 25.4,10.93 25.4,11.43 19.9,11.93 23.9,11.93 24.9,11.93 25.4,11.93 22.9,12.43 24.9,12.43 22.9,12.93 23.4,12.93 24.9,12.93 28.4,13.43 19.9,14.43 24.9,14.93 26.4,14.93 20.4,15.43 23.4,15.93 28.9,15.93
  other v7: 26.7,13.35 28.776,17.306 27.025,17.45 26.145,17.645 28.32,17.72 26.95,17.925 28.828,18.068
  other v9: 21.82,2.845 23.02,2.845 24.32,2.845 25.42,2.845 25.2,8.88 4.4,13.48 9.837,14.45 29.12,17.145 28.195,17.37 27.945,17.645 25.77,17.67 29.195,17.97
  other v11: 15.15,11.25 14.75,14.6
GNDADC: C123.2 C124.2 L6.2 U1.A12 U1.A13 U1.B12 U1.B13 U1.C12 | length 39.6
  Top Layer w0.15: v4(22.675,19.35) 24.275,19.35 24.8,19.875 24.825,19.875 24.85,19.9 25.4,19.9 26,19.3 26.025,19.3 26.05,19.275 v6(27.925,18.925) ; U1.A13@22.875,7.025 U1.B13@22.875,7.35 ; U1.A13@22.925,7.025 U1.A13@22.95,7.025 ; U1.B13@22.975,7.375 U1.B12@23.325,7.375 ; U1.A12@23.375,7.025 U1.B12@23.375,7.35 ; U1.B12@23.375,7.525 U1.C12@23.375,7.85 ; v8(38.175,18.3) 38.425,18.3 38.45,18.275 38.475,18.275 38.5,18.25 38.525,18.25 38.55,18.225 38.575,18.225 38.6,18.2 38.625,18.2 38.65,18.175 L6.2@38.675,18.175
  L3-SIG w0.15: v1(18.275,8.45) 18.275,10.7 18.25,10.725 18.25,10.75 18.225,10.775 18.225,12.2 18.175,12.25 18.175,12.275 18.15,12.3 18.15,12.325 18.125,12.35 18.125,14.2 17.55,14.775 17.55,14.8 17.525,14.825 17.525,15.9 17.55,15.925 17.55,15.95 17.825,16.225 17.825,16.875 17.85,16.9 17.85,16.925 18.05,17.125 18.05,17.45 18.075,17.475 18.075,17.5 18.225,17.65 18.25,17.65 18.275,17.675 19.05,17.675 19.325,17.95 19.35,17.95 19.375,17.975 20,17.975 21.35,19.325 21.375,19.325 21.4,19.35 v4(22.675,19.35) ; v1(31.95,19.575) 32.4,19.825 32.975,19.825 33,19.85 33.025,19.85 33.05,19.875 35.125,19.8 v1(36.2,19.3)
  L4-SIG w0.15: v1(18.275,8.45) 19.45,8.45 20.25,7.65 20.275,7.65 20.3,7.625 v3(21.4,6.95) ; v9(22.545,6.991) v6(22.912,6.943) ; v1@23.4,7.925 v3(23.625,8.25) ; v3(28.175,18.6) 28.95,18.6 29,18.65 29.025,18.65 29.05,18.675 v3(30,18.675) ; v3(31.125,19.175) 31.3,19.175 31.325,19.2 31.35,19.2 31.375,19.225 31.4,19.225 31.425,19.25 31.45,19.25 31.475,19.275 31.5,19.275 31.525,19.3 31.55,19.3 31.575,19.325 31.6,19.325 31.625,19.35 31.65,19.35 31.675,19.375 31.7,19.375 31.725,19.4 31.75,19.4 31.775,19.425 31.8,19.425 v1(31.95,19.575) ; v1(36.2,19.3) v8(38.175,18.3)
  Bottom Layer w0.15: v3(21.4,6.95) v9(22.545,6.991) ; v3(23.625,8.25) C123.2@23.85,8.775 ; C124.2@28.1,18.6 v3(28.175,18.6) ; v3(30,18.675) 30.05,18.675 30.175,18.8 30.2,18.8 30.225,18.825 v3(31.125,19.175)
  other v1: 22.912,6.943 23.4,7.93 27.925,18.925
  other v2: 21.4,6.95 23.625,8.25 28.175,18.6 30,18.675 27.925,18.925 31.125,19.175
  other v3: 27.925,18.925
  other v5: 22.675,19.35
  other v6: 23.4,7.93
  other v7: 22.912,6.943 23.4,7.93 27.925,18.925
  other v10: 22.545,6.991
LD4_A: LD4.A R108.2 | length 7.5
  Top Layer w0.076: LD4.A@5.075,4.675 5.1,4.7 5.425,4.7 5.85,5.125 v8(6.325,5.125)
  L4-SIG w0.076: v8(6.325,5.125) 7.95,6.4 9.3,7.7 9.95,7.7 10.075,7.825 10.225,7.975 10.225,8.925 v3(10.275,9.025)
  other v2: 10.275,9.025
LDQM: U1.U8 U3.E8 | length 11.4
  L3-SIG w0.1: v1(34.775,14.375) v4(34.85,13.85)
  L4-SIG w0.1: v1@25.4,14.925 25.55,15 26.002,15.452 ; 25.975,15.425 26.25,15.15 26.3,15.125 26.675,15.125 26.75,15.2 26.775,15.2 26.8,15.225 26.85,15.25 27.5,15.825 ; 27.49,15.825 29.95,15.825 30.264,15.783 ; 30.275,15.775 30.3,15.75 30.325,15.75 30.35,15.725 30.5,15.7 30.55,15.7 30.575,15.675 31.225,15.65 ; 31.217,15.656 32.2,15.525 32.225,15.5 32.25,15.5 34.5,15.325 34.525,15.3 34.55,15.3 34.6,15.275 34.725,15.15 34.725,15.125 34.75,15.1 34.75,15.075 34.775,15.05 v1(34.775,14.375)
  other v1: 25.4,14.93
  other v5: 34.85,13.85
  other v6: 25.4,14.93
  other v7: 25.4,14.93
LED0_B: LD0.2 U1.N17 | length 22.1
  Top Layer w0.076: v4(22.5,10.475) 22.8,10.175 23.525,10.175 23.65,10.05 23.65,9.825 23.8,9.675 26,9.675 26.575,10.25 v4(26.575,10.325)
  L3-SIG w0.076: v7@20.9,12.925 21.275,12.575 22.3,11.55 22.5,11.325 v4(22.5,10.475) ; v4(26.575,10.325) 26.95,10.325 27.225,10.05 27.25,10.05 27.275,10.025 27.425,10.025 27.775,9.675 29.6,7.925 29.65,7.9 30.15,7.9 30.175,7.875 32.425,7.875 32.95,7.625 37.5,7.625 37.525,7.6 37.55,7.6 37.65,7.5 37.65,7.475 37.675,7.45 v4(37.675,5.55)
  other v5: 37.675,5.55 26.575,10.325 22.5,10.475
  other v6: 20.9,12.93
  other v7: 20.9,12.93
LED0_G: LD0.6 U1.R18 | length 25.1
  L3-SIG w0.076: v7@20.4,13.925 20.775,14.2 23.65,14.2 23.825,14.375 23.85,14.375 23.875,14.4 24.025,14.4 24.05,14.375 24.075,14.375 24.975,13.475 v1(25,13.475) ; v1(32.525,9.125) 32.85,8.825 32.925,8.775 33,8.725 33.075,8.675 33.1,8.65 33.3,8.65 33.325,8.625 33.35,8.625 34.175,7.8 37.55,7.8 37.6,7.775 37.625,7.75 37.65,7.75 37.8,7.6 37.8,7.575 37.825,7.55 37.85,7.5 37.85,5.775 37.95,5.675 37.95,4.125 v4(37.925,4.1)
  L4-SIG w0.076: v1(25,13.475) 25.125,13.35 25.125,12.375 25.15,12.35 25.15,12.3 25.625,11.825 25.625,10.875 25.65,10.85 25.65,10.8 25.8,10.65 25.825,10.65 25.85,10.625 25.875,10.625 25.925,10.575 25.95,10.575 25.975,10.55 26,10.55 26.6,9.95 26.8,9.95 27.3,9.45 27.7,9.45 27.75,9.425 27.85,9.325 29.2,9.325 29.35,9.175 29.4,9.175 29.425,9.15 29.525,9.15 v1(32.525,9.125)
  other v5: 37.925,4.1
  other v6: 20.4,13.93
  other v7: 20.4,13.93
LED0_R: LD0.4 U1.U17 | length 23.9
  Top Layer w0.076: U1.U17@20.975,14.875 21.5,14.35 25.675,14.35 v4(25.7,14.375) ; LD0.4@37.925,4.875 37.975,5 38.125,5.15 38.125,5.325 38.15,5.35 v4(38.25,5.575)
  L3-SIG w0.076: v4(25.7,14.375) 26,14.075 26.35,14.075 27.25,13.175 27.25,12.05 28.5,10.8 28.85,10.8 28.9,10.775 28.925,10.75 28.95,10.75 29.15,10.6 29.175,10.575 29.225,10.575 29.25,10.55 29.3,10.55 29.35,10.525 v1(29.825,10.5) ; v1(31.85,9.725) 32.175,9.4 32.6,9.4 32.625,9.375 32.65,9.375 33.2,8.825 33.35,8.825 33.375,8.8 33.4,8.8 33.45,8.775 34.25,7.975 37.6,7.975 37.625,7.95 37.65,7.95 37.7,7.925 37.725,7.9 37.75,7.9 37.95,7.7 37.975,7.65 37.975,7.625 38,7.6 38,7.575 38.025,7.55 38.025,5.85 38.1,5.775 38.1,5.75 38.125,5.725 v4(38.25,5.575)
  L4-SIG w0.076: v1(29.825,10.5) 30.15,10.175 30.15,9.825 30.3,9.675 31.8,9.675 v1(31.85,9.725)
  other v5: 38.25,5.575 25.7,14.375
LED1: R83.1 U1.N18 | length 18
  Top Layer w0.076: U1.N18@20.475,12.975 20.575,12.975 20.775,13.175 21.025,13.175 v4(21.825,13.1) ; v6(26.15,7.175) v4(26.15,8.225) ; v4(32.25,6.85) 32.55,7.15 33.5,7.15 R83.1@34.575,6.65
  L3-SIG w0.076: v4(21.825,13.1) 22.6,12.325 v1(22.9,12.325) ; v3(25.475,9.45) 26.15,8.775 v4(26.15,8.225) ; v6(26.15,7.175) 26.525,7.15 26.55,7.15 26.575,7.125 26.6,7.125 26.625,7.1 26.65,7.1 26.675,7.075 26.7,7.075 26.725,7.05 26.75,7.05 26.775,7.025 26.8,7.025 26.825,7 26.875,7 26.9,6.975 32.125,6.975 v4(32.25,6.85)
  Bottom Layer w0.076: v1(22.9,12.325) 23.5,11.425 v3(25.475,9.45)
  other v1: 25.475,9.45
  other v2: 25.475,9.45 22.9,12.325
  other v3: 22.9,12.325
  other v5: 32.25,6.85 26.15,8.225 21.825,13.1
  other v7: 26.15,7.175
LED2: R84.1 U1.M19 | length 23.4
  Top Layer w0.076: U1.M19@19.95,12.5 v4(20,12.55)
  L3-SIG w0.076: v4(20,12.55) 20.15,12.55 20.775,13.175 21.5,13.175 21.7,13.375 22.1,13.375 22.125,13.4 22.45,13.4 22.65,13.2 23.975,13.2 24.025,13.175 24.325,12.875 v1(24.45,12.875) ; v1(35.275,11.2) 35.4,11.075 35.95,11.075 35.975,11.05 36.55,11.05 36.575,11.025 36.775,11.025 36.8,11 36.825,11 36.85,10.975 36.875,10.975 37.1,10.75 37.1,10.725 37.125,10.7 37.15,10.65 37.15,9.6 37.5,9.25 37.5,9.225 37.525,9.2 37.525,8.65 37.55,8.625 37.55,8.6 37.575,8.575 37.575,8.325 38.1,7.8 38.1,7.775 38.125,7.75 38.15,7.7 38.15,7.675 38.175,7.65 38.2,7.6 38.2,6.75 v4(38.325,6.625)
  L4-SIG w0.076: v9(28.825,13.125) 28.925,13.025 31.525,13.025 31.65,13.15 31.9,13.15 32.775,12.275 32.8,12.275 32.875,12.225 32.975,12.15 33.075,12.075 33.175,12 33.25,11.95 33.35,11.875 33.45,11.8 33.55,11.725 33.625,11.675 33.725,11.6 33.825,11.525 33.925,11.45 34,11.4 34.1,11.325 34.2,11.25 v1(35.275,11.2)
  Bottom Layer w0.076: v1(24.45,12.875) 24.925,12.975 26.125,13 26.375,13 26.425,12.95 28.6,12.95 28.625,12.975 v9(28.825,13.125)
  other v2: 24.45,12.875
  other v3: 24.45,12.875
  other v5: 38.325,6.625 20,12.55
  other v10: 28.825,13.125
N$BTN: BTN.3 BTN.4 R85.1 R86.2 | length 33.6
  Top Layer w0.076: R86.2@20.8,3.375 v4(20.825,3.375) ; v5(22.735,4.11) 25.775,4.375 26.1,4.375 27.4,3.95 27.425,3.95 27.45,3.925 29.45,3.925 29.475,3.9 29.5,3.9 29.525,3.875 29.55,3.875 29.575,3.85 29.6,3.85 29.625,3.825 29.675,3.825 29.7,3.8 29.725,3.8 29.75,3.775 29.8,3.75 29.85,3.725 30.125,3.725 30.15,3.7 30.475,3.7 30.5,3.675 30.8,3.675 30.825,3.65 31.15,3.65 31.175,3.625 31.475,3.625 31.5,3.6 31.825,3.6 31.85,3.575 32.175,3.575 32.2,3.55 32.5,3.55 32.525,3.525 32.85,3.525 32.875,3.5 33.2,3.5 33.225,3.475 33.525,3.475 33.55,3.45 v4(39.35,3.45) ; BTN.3@41.3,3.875 41.925,3.875 BTN.4@45.275,3.875 ; 41.7,3.875 41.7,6.65 40.85,9.15 41,9.45 41,10.1 41.05,10.15 41.05,10.825 41.275,11.05 41.625,11.05 41.8,11.225 R85.1@42.05,11.775
  L3-SIG w0.076: v4(20.825,3.375) 21.775,3.575 22.2,3.575 v5(22.735,4.11) ; v4(39.35,3.45) v4(41.125,3.975)
  other v4: 22.735,4.11
  other v5: 20.825,3.375 39.35,3.45 41.125,3.975
N$LD0B: LD0.1 R80.2 | length 8.7
  Top Layer w0.076: LD0.1@39.275,5.25 39.45,5.175 40.35,4.275 40.35,3.669 46.244,3.669 ; 46.25,3.675 46.325,3.75 46.325,4.075 46.35,4.1 R80.2@46.475,4.3
N$LD0G: LD0.5 R82.2 | length 11.1
  Top Layer w0.076: LD0.5@39.275,3.8 39.925,3.5 46.3,3.5 46.35,3.525 46.85,4.025 47.9,4.025 47.95,4.075 48.45,4.075 48.525,4.15 48.525,4.75 R82.2@49.2,5.425
N$LD0R: LD0.3 R81.2 | length 7.1
  Top Layer w0.076: v4(43.3,5.45) R81.2@46.475,5.45
  L3-SIG w0.076: v4(39.425,4.775) v4(43.3,5.45)
  other v5: 39.425,4.775 43.3,5.45
N$LD1A: LD1.A R83.2 | length 0.9
  Top Layer w0.076: LD1.A@33.15,5.025 R83.2@33.275,5.95
N$LD2A: LD2.A R84.2 | length 0.9
  Top Layer w0.076: LD2.A@36.35,5.025 R84.2@36.475,5.95
NetL3_1: L3.1 U7.5 | length 1.7
  Bottom Layer w0.4: L3.1@5.45,12.1 5.55,12.125 6.15,12.725 6.2,12.75 6.225,12.75 6.25,12.775 U7.5@6.925,12.775
NODE_P0: R10.1 R11.2 R12.2 | length 5
  Top Layer w0.076: R10.1@34.775,16.775 34.8,16.675 34.825,16.625 34.85,16.6 34.85,16.575 34.9,16.525 34.9,16.25 35.05,16.1 v4(35.6,16.1) ; v4(36.05,15.7) 36.125,15.775 37.075,15.775 37.225,15.925 37.225,16.6 ; R11.2@36.575,16.775 36.8,16.675 36.875,16.6 37.275,16.6 37.45,16.775 R12.2@37.55,16.775
  L3-SIG w0.076: v4(35.6,16.1) v4(36.05,15.7)
  other v5: 36.05,15.7 35.6,16.1
NODE_P1: R14.1 R15.2 R16.2 | length 23.8
  Top Layer w0.076: R15.2@19.575,16.85 19.825,16.725 19.85,16.725 19.875,16.7 20.275,16.7 20.425,16.85 R16.2@20.575,16.85 ; R16.2@20.575,17.075 20.2,17.45 20.2,17.7 20.25,17.75 20.25,18.425 20.325,18.5 24.975,18.5 25.325,18.85 25.35,18.85 25.375,18.875 v4(25.65,19.1) ; v4(32.875,19.25) 35.4,18.775 35.425,18.75 35.7,18.75 35.725,18.725 36.425,18.725 36.45,18.7 37.175,18.7 37.2,18.675 37.9,18.675 37.925,18.65 38.175,18.65 38.225,18.625 38.25,18.6 38.275,18.6 38.3,18.575 38.325,18.575 38.35,18.55 38.4,18.55 38.45,18.525 38.475,18.5 38.5,18.5 38.55,18.475 38.575,18.45 38.6,18.45 38.65,18.425 38.675,18.4 39.525,18.4 39.6,18.325 39.6,17 R14.1@39.575,16.975
  L3-SIG w0.076: v4(25.65,19.1) 28.45,19.25 v4(32.875,19.25)
  other v5: 25.65,19.1 32.875,19.25
PROG#: R4.1 R99.1 U2.21 | length 7.4
  L3-SIG w0.076: v4(12.05,3.15) v1(13.55,4.475)
  L4-SIG w0.076: v3(9.225,6.95) 9.75,5.98 10.4,6.03 11.25,5.43 v3(11.875,4.975)
  Bottom Layer w0.076: v3(11.875,4.975) 13.175,4.975 R99.1@13.55,4.675
  other v2: 13.55,4.475 11.875,4.975 9.225,6.95
  other v3: 13.55,4.475
  other v5: 12.05,3.15
PUDC_B: R23.2 U1.E18 | length 16.6
  Top Layer w0.076: v8(22.15,11.1) 22.65,11.6 22.65,12.025 22.675,12.05 22.675,12.075 22.775,12.175 23,12.175 23.15,12.325 23.15,12.525 23.175,12.55 23.175,12.575 23.275,12.675 23.5,12.675 23.65,12.825 23.65,13.025 23.675,13.05 23.675,13.075 23.85,13.25 23.925,13.25 24.125,13.45 v4(24.225,13.45)
  L3-SIG w0.076: v1(20.025,8.85) v7@20.4,8.925 ; v3(27.625,16.15) 27.8,15.925 ; 27.799,15.925 28.225,15.925 28.25,15.95 28.3,15.95 v1(29.175,16.125)
  L4-SIG w0.076: v1(20.025,8.85) 20.35,9.175 v9(20.55,10.05) ; v1(29.175,16.125) 29.35,16.075 29.4,16.05 29.65,16.05 29.7,16.075 29.8,16.175 29.9,16.175 29.925,16.2 29.95,16.2 30.25,16.5 30.475,16.5 30.675,16.7 30.675,16.85 30.7,16.875 30.7,16.9 30.875,17.075 30.9,17.075 31.05,17.225 v1(31.425,17.35)
  Bottom Layer w0.076: v9(20.55,10.05) v8(22.15,11.1) ; v4(24.225,13.45) 24.275,13.5 24.575,13.5 25.25,14.175 25.25,14.25 25.275,14.275 25.275,14.3 26.1,15.125 26.475,15.125 26.525,15.15 26.95,15.575 26.95,16.1 v3(27.625,16.15)
  other v1: 24.225,13.45 27.625,16.15
  other v2: 27.625,16.15
  other v5: 24.225,13.45
  other v6: 20.4,8.93 31.425,17.35
  other v7: 20.4,8.93 31.425,17.35
  other v9: 24.225,13.45
  other v10: 20.55,10.05 24.225,13.45
PWR_CHRG: LD4.K U8.21 | length 14.5
  Top Layer w0.076: LD4.K@5.975,4.675 v4(5.975,4.7)
  L3-SIG w0.076: v4(5.975,4.7) 5.525,6.475 5.525,7.75 5.735,7.96 5.735,8.735 5.8,8.8 5.85,8.85 8.375,11.375 8.375,13 9.475,14.1 10,14.1 11.625,15.725 v1(12.125,15.95)
  other v2: 12.125,15.95
  other v3: 12.125,15.95
  other v5: 5.975,4.7
PWR_CLPROG: C161.2 R103.1 U8.2 | length 5.6
  L4-SIG w0.076: v3(3.925,16.675) 3.925,16.125 4.1,15.95 v3(4.65,15.95) ; v2(5.3,15.95) 5.525,16.175 5.525,16.25 5.525,16.375 5.6,16.45 7.55,16.45 7.85,16.75 8.25,16.75 8.625,16.375 v3(8.625,16.125)
  Bottom Layer w0.076: v3(3.925,16.675) C161.2@3.925,16.7
  other v2: 4.65,15.95 8.625,16.125 3.925,16.675
  other v3: 5.3,15.95
PWR_FB1: C168.2 L9.2 U8.6 | length 1.8
  Bottom Layer w0.076: C168.2@5.4,18.75 L9.2@5.975,19.05 ; L9.2@7.775,19.05 8.025,18.775 8.1,18.7 8.1,18.35 U8.6@8.325,18.125
PWR_FB2: C163.2 R113.2 R114.1 U8.17 | length 19.2
  L3-SIG w0.076: v1(9.8,14.85) 11.375,16.575 12.55,17.75 v2(12.55,18.05) 13.05,18 14.375,16.3 15.675,15 15.675,14.575 15.875,14.375 15.875,13.775 v1(15.95,13.7)
  L4-SIG w0.076: v3(7.5,13.9) 7.75,14.15 8.675,14.15 8.975,14.45 9,14.45 9.025,14.475 9.525,14.475 9.525,14.575 v1(9.8,14.85) ; v2(12.55,18.05) 13.3,18.05 v3(14.4,18.945) ; v1(15.95,13.7) v3(15.975,12.8)
  Bottom Layer w0.076: v3(7.5,13.9) 7.975,13.25 8.375,12.85 8.375,12.7 8.575,12.5 R114.1@8.65,12.475 ; v2@14.475,19 14.6,19.125 14.6,20 14.675,20.075 C163.2@14.7,20.175
  other v1: 12.55,18.05
  other v2: 15.975,12.8 7.5,13.9 14.4,18.945
  other v3: 12.55,18.05
PWR_FB3: C164.1 C165.2 C166.2 R115.2 R116.1 U8.7 | length 15.7
  L3-SIG w0.076: v1(9.125,14.175) 9.135,14.45 9.135,15.9 v1(9.125,16.2)
  L4-SIG w0.076: v3(5.45,19.15) v3(8.425,18.625) ; v3(8.325,12.2) 8.325,13.3 v1(9.125,14.175) ; v3(8.875,18.45) 9.125,17.65 v1(9.125,16.2)
  Bottom Layer w0.076: C164.1@5.275,19.35 5.25,19.45 5.075,19.625 5.075,20.075 5.275,21.175 5.375,21.35 5.625,21.6 5.625,21.625 5.65,21.65 5.65,21.675 5.85,21.875 6.75,21.875 R115.2@6.95,21.725 ; R115.2@7.15,21.725 7.275,21.925 7.35,22 7.35,22.35 7.425,22.425 7.875,22.425 8.025,22.275 C165.2@8.15,22.225 ; C166.2@7.775,11.65 R116.1@8.125,12 ; v3(8.875,18.45) U8.7@8.875,18.475
  other v2: 8.325,12.2 8.875,18.45 8.425,18.625 5.45,19.15
PWR_FB3_FF: C166.1 R118.2 | length 0.3
  Bottom Layer w0.076: C166.1@7.775,10.85 R118.2@8.125,10.85